# Altium PCB Tarjeta Telemining V1.1 - PCB.PcbDoc
Units mm, origin at the board's own origin, x right, y up, seen from the top; angles counter-clockwise.
Board outline 135.5 x 70.98 mm, 2 copper layers (Top Layer, Bottom Layer); 56 components, 60 nets, 228 pads, 104 vias.
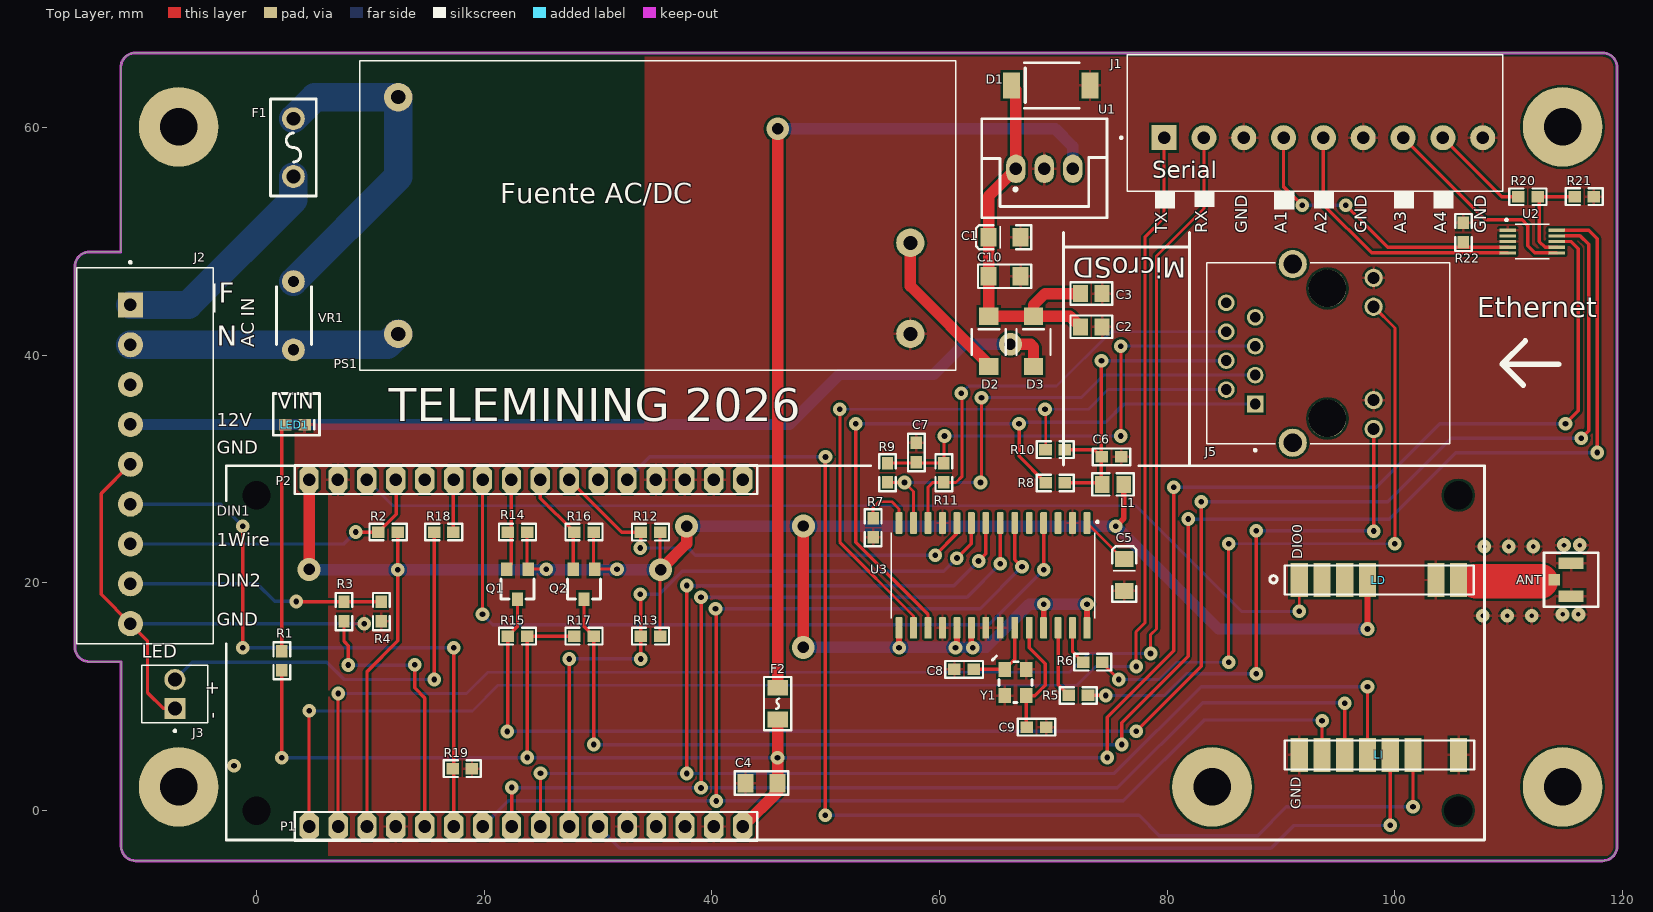
[diagram p0: Top Layer view]
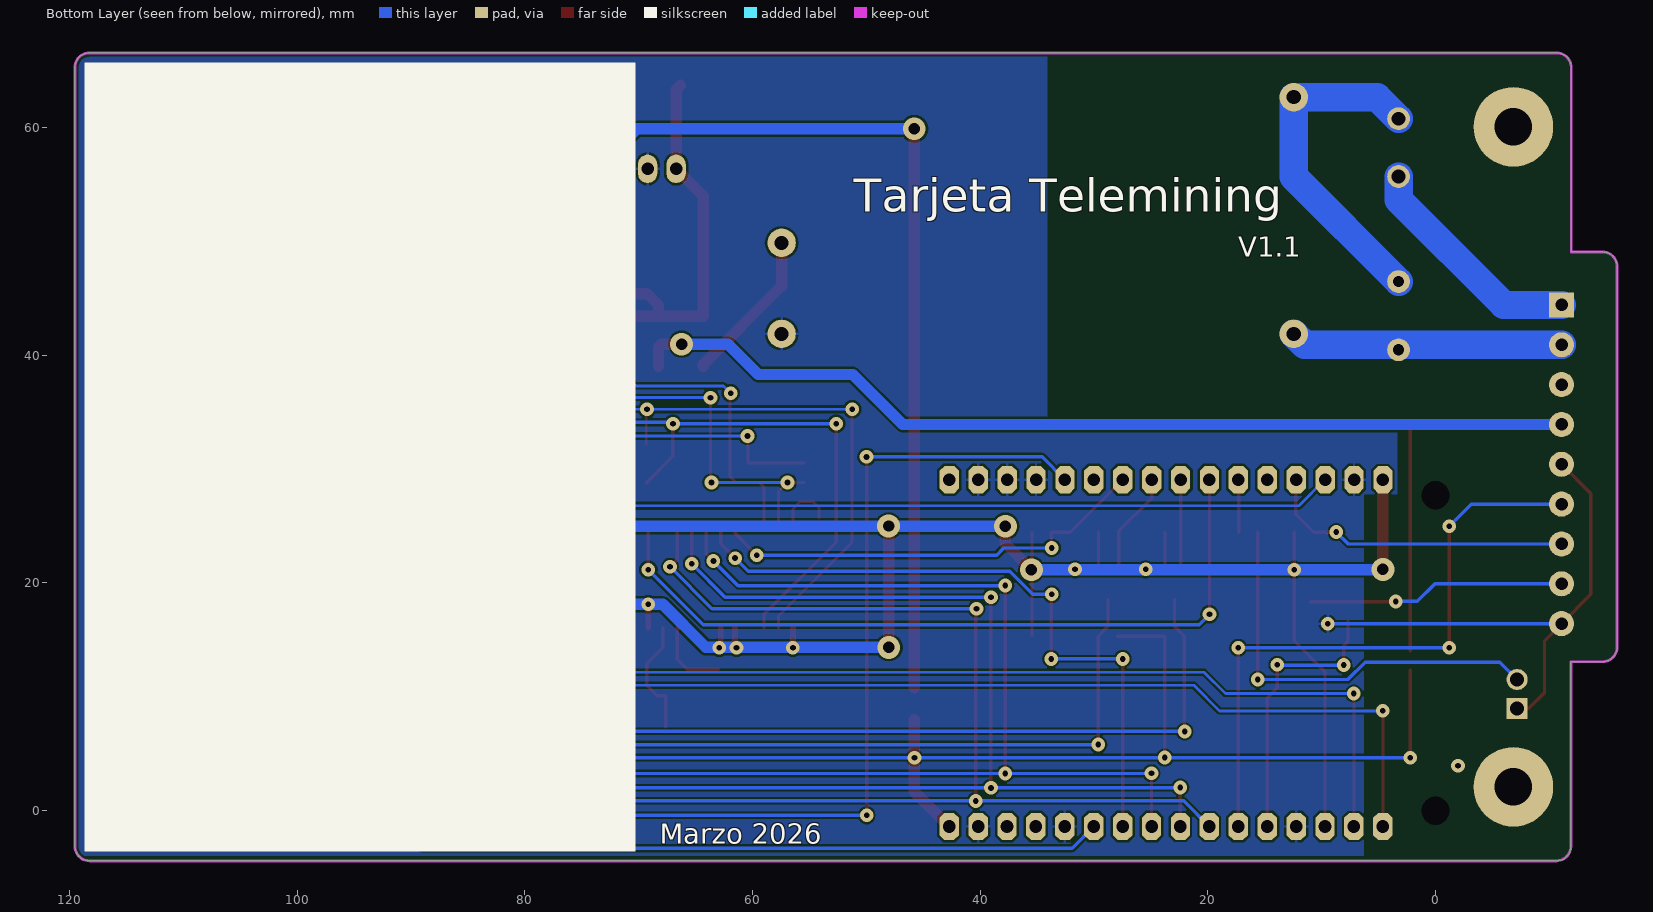
[diagram p1: Bottom Layer view, seen from below]

## Layer stack, top to bottom
Top Layer: signal copper 0.0356
Dielectric: dielectric 0.32, FR-4, Dk 4.8
Bottom Layer: signal copper 0.0356

## Board outline
-15.954,14.351 -15.954,47.811 cw(c-14.684,47.811) -14.684,49.081 -11.925,49.081 -11.925,65.303 cw(c-10.655,65.303) -10.655,66.573 118.275,66.573 cw(c118.275,65.303) 119.545,65.303 119.545,-3.141 cw(c118.275,-3.141) 118.275,-4.411 -10.621,-4.411 cw(c-10.621,-3.141) -11.891,-3.141 -11.891,13.081 -14.684,13.081 cw(c-14.684,14.351)

## Design rules (kind name [scope] priority, off if disabled: settings)
Clearance [All] p1: gap=0.2
PolygonConnect [All] p1: connectstyle=Relief reliefconductorwidth=0.254 reliefentries=4 polygonreliefangle="90 Angle"
RoutingVias [All] p1: holewidth=0.711 width=1.27 viastyle="Through Hole" minholewidth=0.711 minwidth=1.27 maxholewidth=0.711 maxwidth=1.27
SilkscreenOverComponentPads [All] p1: minsilkscreentomaskgap=0.254
SolderMaskExpansion [All] p1: expansion=0.102
Width [All] p1: maxlimit=5 minlimit=0.254 preferedwidth=0.254 minimp=50.000000 maximp=50.000000 favimp=50.000000
27 further rules are at their usual default settings.

## Components (designator, comment, footprint, x,y, rotation, side; value= is the part's Value field where it differs from the comment)
ANT "Tipo Conector" UFL 115.515,20.282 r270 top
C1 "10uF" "Cap tant 10uF 1206 SMD" 67.128,50.381 r180 top
C2 "1uF" "Cap 1uF 0805 SMD" 73.351,42.507 r180 top
C3 "1uF" "Cap 1uF 0805 SMD" 73.351,45.428 r180 top
C4 "10uF" "Cap 10uF 1206 SMD" 45.768,2.413 r180 top
C5 "10uF" "Cap tant 10uF 1206 SMD" 76.248,19.304 r90 top
C6 "10nF" "Cap 0.1uF 0603 SMD" 75.129,31.077 r0 top
C7 "10nF" "Cap 0.1uF 0603 SMD" 57.984,31.458 r90 top
C8 "18pF" "Cap 0.1uF 0603 SMD" 62.175,12.408 r0 top
C9 "18pF" "Cap 0.1uF 0603 SMD" 68.525,7.328 r180 top
C10 "22uF" "Cap 22uF 1206 SMD" 64.334,46.952 r0 top
D1 "Diodo TVS SMD SMBJ20A" "Diodo TVS SMD SMBJ20A" 69.795,63.716 r180 top
D2 "Diodo Schottky SMD" "Diodo CDBA340-G DO-214AC SMD" 64.334,41.237 r90 top
D3 "Diodo Schottky SMD" "Diodo CDBA340-G DO-214AC SMD" 68.271,41.237 r90 top
F1 "Fuse 3A/300V TH" "Fuse 3A/300V TH" 3.247,55.715 r90 top
F2 "Fusible 0.35A SMD" "FUSE 0805 SMD" 45.792,10.795 r270 top
J1 "1985030" PHOENIX_1985030 76.488,54.421 r0 top
J2 "1985030" PHOENIX_1985030 -15.779,47.676 r270 top
J3 "0022292021" MOLEX_0022292021 -7.167,10.249 r270 top
J5 "1664077" PHOENIX_1664077 104.847,32.22 r90 top
L1 "10uF" "Ferrita 3A 30 Ohm 0805" 75.256,28.664 r0 top
LD "Header 8" "Header M8"#1 91.617,20.258 r0 top
LED1 "PWR" "LED Rojo 0603" 3.374,33.898 r0 top
LI "Header 8" "Header M8"#2 91.617,4.891 r0 top
P1 "Header 16" HDR1X16 4.63,-1.397 r0 top locked
P2 "Header 16" HDR1X16 4.62,29.083 r0 top locked (schematic designator P4)
PS1 "IRM-15-12" CONV_IRM-15-12 35.251,52.286 r0 top
Q1 "BSS123" "MOSFET BSS123  SMD SOT-23" 22.932,19.901 r180 top
Q2 "BSS123" "MOSFET BSS123  SMD SOT-23" 28.774,19.901 r180 top
R1 "1K" "Res 1K 0603 1/8W" 2.231,13.17 r270 top
R2 "1K" "Res 1K 0603 1/8W" 11.564,24.473 r0 top
R3 "1K" "Res 1K 0603 1/8W" 7.692,17.488 r270 top
R4 "1K" "Res 1K 0603 1/8W" 10.97,17.488 r270 top
R5 "1K" "Res 1K 0603 1/8W" 72.208,10.122 r180 top
R6 "1K" "Res 1K 0603 1/8W" 73.478,13.043 r180 top
R7 "2K7" "Res 1K 0603 1/8W" 54.174,24.854 r270 top
R8 "50R 1%" "Res 1K 0603 1/8W" 70.176,28.791 r180 top
R9 "50R 1%" "Res 1K 0603 1/8W" 55.444,29.68 r270 top
R10 "50R 1%" "Res 1K 0603 1/8W" 70.174,31.712 r0 top
R11 "50R 1%" "Res 1K 0603 1/8W" 60.397,29.68 r90 top
R12 "10K" "Res 1K 0603 1/8W" 34.616,24.473 r180 top
R13 "100K" "Res 1K 0603 1/8W" 34.616,15.329 r180 top
R14 "10K" "Res 1K 0603 1/8W" 22.931,24.473 r0 top
R15 "10K" "Res 1K 0603 1/8W" 22.931,15.329 r0 top
R16 "10K" "Res 1K 0603 1/8W" 28.773,24.473 r0 top
R17 "10K" "Res 1K 0603 1/8W" 28.775,15.329 r180 top
R18 "1K" "Res 1K 0603 1/8W" 16.455,24.473 r0 top
R19 "10K" "Res 1K 0603 1/8W" 18.082,3.683 r0 top
R20 "100K" "Res 1K 0603 1/8W" 111.705,53.937 r180 top
R21 "100K" "Res 1K 0603 1/8W" 116.658,53.937 r0 top
R22 "10K" "Res 1K 0603 1/8W" 106.045,50.8 r270 top
U1 "OKI-78SR series non-isolated switching regulator" "Reg DC/DC OKI-78SR TH" 66.723,56.388 r0 top
U2 "ADS1115IDGST" SOP50P490X110-10N 112.086,50 r0 top
U3 "ENC28J60-I/SO" SOIC127P1030X265-28N 64.715,20.663 r270 top
VR1 "VARISTOR B72210S0351K101" "VARISTOR  B72210S0351K101" 3.247,41.745 r90 top
Y1 "25MHz" "XTAL 24MHz SMD" 65.731,12.408 r270 top

## Footprints (in the part's own frame and the unit in brackets; to place one, negate y for a bottom-side part, rotate by r counter-clockwise, add the part's x,y. Pads: shape width x height; smd on the part's side, far side on the other; paste and mask are expansions set on the pad)
"Cap 0.1uF 0603 SMD" [mm] "490-1532-2-ND, 81-GRM39X104K16, GRM188R71C104KA01D"
  rect 1.1x1 smd: 1(-0.85,0) 2(0.85,0)
  silkscreen extent -1.65,-0.74 1.65,0.74
"Cap 1uF 0805 SMD" [mm] "490-3903-1-ND, 81-GRM21F51H105ZA12L, GRM21BF51H105ZA12L"
  rect 1.3x1.5 smd: 1(-0.95,0) 2(0.95,0)
  silkscreen extent -1.83,-0.98 1.83,0.98
"Cap 10uF 1206 SMD" [mm] "587-1353-1-ND, 963-TMK316F106ZL-T, TMK316F106ZL-T"
  rect 1.4x1.6 smd: 1(2.8,0) 2(0,0)
  silkscreen extent -0.94,-1.04 3.74,1.03
"Cap 22uF 1206 SMD" [mm] "587-1433-1-ND, 963-EMK316BJ226ML-T, EMK316BJ226ML-T"
  rect 1.4x1.6 smd: 1(2.8,0) 2(0,0)
  silkscreen extent -0.94,-1.03 3.74,1.03
"Cap tant 10uF 1206 SMD" [mm] "478-1655-1-ND, 581-TAJA106K016R, TAJA106K016RNJ"
  rect 1.4x1.6 smd: 1(2.8,0) 2(0,0)
  silkscreen extent -0.95,-1.06 3.91,1.05
CONV_IRM-15-12 [mm]
  round 2.5 hole 1.24: +V(22.2,-2.4) -V(22.2,-10.4) AC/L(-22.8,10.4) AC/N(-22.8,-10.4)
  silkscreen extent -26.2,-13.6 26.2,13.6
"Diodo CDBA340-G DO-214AC SMD" [mm] "641-1101-1-ND, 750-CDBA340-G, CDBA340-G"
  rect 1.5x1.7 smd: 1(-2.2,0) 2(2.2,0)
  silkscreen extent -1.21,-1.5 1.06,1.5
"Diodo TVS SMD SMBJ20A" [mm] "SMBJ20ABTR-ND"
  rect 1.5x2.3 smd: 1(-3.44,0) 2(3.44,0)
  silkscreen extent -2.5,-2 2.34,2
"Ferrita 3A 30 Ohm 0805" [mm] "MH2029-300YCT-ND,,MH2029-300Y"
  rect 1.3x1.5 smd: 1(-0.95,0) 2(0.95,0)
  silkscreen extent -1.83,-0.98 1.83,0.98
"Fuse 3A/300V TH" [mm] "F5461CT-ND"
  round 2 hole 1.2: 1(0,0) 2(5.08,0)
  silkscreen extent -1.7,-2 6.8,2
"FUSE 0805 SMD" [mm] "F3732CT-ND, 576-1206L035/16YR, 1206L035/16YR"
  rect 1.4x1.8 smd: 1(0,0) 2(2.8,0)
  silkscreen extent -0.94,-1.2 3.74,1.2
HDR1X16 [mm] "Connector; Header; 16 Position"
  oct 1.7x2.4 hole 1.1: 1(0,0) 2(2.54,0) 3(5.08,0) 4(7.62,0) 5(10.16,0) 6(12.7,0) 7(15.24,0) 8(17.78,0) 9(20.32,0) 10(22.86,0) 11(25.4,0) 12(27.94,0) 13(30.48,0) 14(33.02,0) 15(35.56,0) 16(38.1,0)
  silkscreen extent -1.27,-1.27 39.37,1.27
"Header M8"#1 [mm]
  rect 1.5x3 smd: 1(0,0) 2(2,0) 3(4,0) 4(6,0) 7(12,0) 8(14,0)
  silkscreen extent -1.27,-1.27 15.33,1.27
"Header M8"#2 [mm]
  rect 1.5x3 smd: 1(0,0) 2(2,0) 3(4,0) 4(6,0) 5(8,0) 6(10,0) 8(14,0)
  silkscreen extent -1.27,-1.27 15.37,1.27
"LED Rojo 0603" [mm] "475-2512-1-ND, 720-LSQ976-NR-1, LS Q976-NR-1"
  rect 1.1x1 smd: 1(-0.85,0) 2(0.85,0)
  silkscreen extent 1.7,-0.4 1.7,0.4, body extent -0.85,-0.4 0.75,0.4, height 0.8
MOLEX_0022292021 [mm]
  rect 1.86x1.86 / inner round 1.86 / far side rect 1.86x1.86 hole 1.24: 1(1.27,0)
  round 1.86 hole 1.24: 2(-1.27,0)
  silkscreen extent -2.54,-2.92 3.35,2.88
"MOSFET BSS123  SMD SOT-23" [mm] "BSS123NCT-ND, 512-BSS123, BSS123"
  rect 1x1.2 smd: 1(-0.95,-1.32) 2(0.95,-1.32) 3(0,1.32)
  silkscreen extent -1.44,-0.47 1.44,1.31, body extent -1.75,-1.1 1.75,1.32, height 1.05
PHOENIX_1664077 [mm]
  rect 1.458x1.458 / inner round 1.458 / far side rect 1.458x1.458 hole 0.95: P1(3.505,17.1)
  round 1.458 hole 0.95: P2(4.775,19.64) P3(6.045,17.1) P4(7.315,19.64) P5(8.585,17.1) P6(9.855,19.64) P7(11.125,17.1) P8(12.395,19.64)
  round 1.605 hole 1.07: P11(1.31,6.69) P12(3.85,6.69) P13(12.05,6.69) P14(14.59,6.69)
  round 2.475 hole 1.65: SH1(0.1,13.8) SH2(15.8,13.8)
  round 3.3 hole 3.3 unplated: ""(2.235,10.75) ""(13.665,10.75)
  silkscreen extent -0.65,0 15.9,21.35
PHOENIX_1985030 [mm]
  rect 2.2x2.2 hole 1.1: 1(3.25,4.7)
  round 2.2 hole 1.1: 2(6.75,4.7) 3(10.25,4.7) 4(13.75,4.7) 5(17.25,4.7) 6(20.75,4.7) 7(24.25,4.7) 8(27.75,4.7) 9(31.25,4.7)
  silkscreen extent -0.6,0 33,12
"Reg DC/DC OKI-78SR TH" [mm] "811-2196-5-ND, , OKI-78SR-5/1.5-W36-C"
  oval 1.7x2.5 hole 1.1: 1(0,0) 2(2.5,0) 3(5,0)
  silkscreen extent -3,-4.3 8,4.4, body extent -2.71,-3.3 7.71,5.33, height 16.51
"Res 1K 0603 1/8W" [mm] "RNCP0603FTD1K00CT-ND, 660-SG73S1JTTD1001F, RNCP0603FTD1K00"
  rect 1.1x1 smd: 1(-0.85,0) 2(0.85,0)
  silkscreen extent -1.63,-0.73 1.63,0.73, body extent -1.5,-0.6 1.5,0.6, height 0.6
SOIC127P1030X265-28N [mm]
  rrect25% 1.9x0.6 smd: 1(-4.605,8.255) 2(-4.605,6.985) 3(-4.605,5.715) 4(-4.605,4.445) 5(-4.605,3.175) 6(-4.605,1.905) 7(-4.605,0.635) 8(-4.605,-0.635) 9(-4.605,-1.905) 10(-4.605,-3.175) 11(-4.605,-4.445) 12(-4.605,-5.715) 13(-4.605,-6.985) 14(-4.605,-8.255) 15(4.605,-8.255) 16(4.605,-6.985) 17(4.605,-5.715) 18(4.605,-4.445) 19(4.605,-3.175) 20(4.605,-1.905) 21(4.605,-0.635) 22(4.605,0.635) 23(4.605,1.905) 24(4.605,3.175) 25(4.605,4.445) 26(4.605,5.715) 27(4.605,6.985) 28(4.605,8.255)
  silkscreen extent -4.8,-8.95 3.75,9.27, body extent -5.15,-8.95 5.15,8.95, height 2.65
SOP50P490X110-10N [mm]
  rrect25% 1.47x0.28 smd: 1(-2.15,1) 2(-2.15,0.5) 3(-2.15,0) 4(-2.15,-0.5) 5(-2.15,-1) 6(2.15,-1) 7(2.15,-0.5) 8(2.15,0) 9(2.15,0.5) 10(2.15,1)
  silkscreen extent -2.36,-1.5 1.5,2, body extent -2.45,-1.5 2.45,1.5, height 1.1
UFL [mm]
  rect 1x1 smd: 1(0,-1.5)
  rect 1x2.2 smd: 2(-1.45,0) 2(1.45,0)
  silkscreen extent -2.37,-2.37 2.37,2.37, body extent -1.7,-1.55 1.7,1.55, height 1.25
"VARISTOR  B72210S0351K101" [mm] "495-6461-ND"
  round 2 hole 1: 1(-1.26,0) 2(4.74,0)
  silkscreen extent -0.8,-1.6 4.28,1.5
"XTAL 24MHz SMD" [mm] "XC2477CT-ND,,ECS-240-9-33B-CWN-TR"
  rect 1.3x1.1 smd: 1(0,0) 2(2.3,0) 3(2.3,1.9) 4(0,1.9)
  silkscreen extent -1.18,-1.09 2.9,2.4

## Part data
ANT: library part ANTSMA
C1 C5: library part "Cap 10uF tantalio SMD", "10uF 16V 10%"
C2 C3: library part "Cap 1uF SMD", "1uF 50V"
C4: library part "Cap 10uF SMD", "10uF 25V"
C6 C7 C8 C9: library part "Cap 0.1uF SMD", "0.1uF 16V"
C10: library part "Cap 22uF SMD", "22uF 16V"
D2 D3: "Schottky Rectifiers 40V 3A CDBA340-G"
F2: "PTC 0.35A 16V"
J3: "Connector Header Through Hole 2 position 0.100\" (2.54mm)"
L1: library part Inductor, "BEAD FERRITE 30 OHM 3A"
LD LI: "Header, 8-Pin"
LED1: library part "LED Rojo", "LED Rojo 0603"
P1 P2: "https://lilygo.cc/en-us/products/t-a7608e-h?variant=43932699033781"
PS1: "Enclosed AC DC Converters 1 Uitgang 12V - - - 1.25A 85 ~ 305 VAC, 120 ~ 430 VDC Input"
Q1 Q2: library part "MOSFET N-Channel_2", "MOSFET N-CH 100V 170MA"
R1 R2 R3 R4 R5 R6 R7 R8 R9 R10 R11 R12 R13 R14 R15 R16 R17 R18 R19 R20 R21 R22: library part "Res 1K SMD", "1K SMD"
U1: library part "REG 5V 1.5A OKI 78SR", "Regulator 5V 1.5A"
U2: "16-bit, 860-SPS, 4-channel, delta-sigma ADC with PGA, oscillator, VREF, comparator and I2C"
U3: "8 KB RAM, MAC&PHY, ETHERNET CONTROLLER, 28 PIN SOIC"
Y1: library part "XTAL 24MHz", "CRYSTAL 24MHZ 9PF SMD"

## Free pads (board coordinates)
  round 7 hole 3.3: 0(-6.84,2.083) 0(-6.84,60.083) 0(83.96,2.083) 0(114.76,2.083) 0(114.76,60.083)
  round 1.524 hole 2.5: 0(0,0) 2(0,27.71) 2(105.59,0) 2(105.59,27.71)

## Via types
v1: diameter 1.2, hole 0.5, Top Layer to Bottom Layer, tented both sides, 87 vias
v2: diameter 1.2, hole 0.4, Top Layer to Bottom Layer, tented both sides, 10 vias
v3: diameter 2, hole 1, Top Layer to Bottom Layer, tented both sides, 7 vias

## Nets (pads, with @x,y where several pads share a name; then routed paths per layer and width w, separated by ;. In a path a pad name is that pad's centre, name@x,y a point inside that pad or via, vN(x,y) a via of type N, cw(c..) or ccw(c..) an arc to the next point about the centre after c; other vN are vias at no path point)
3V3: L1.2 LD.4 P1.3 P2.1 Q1.1 Q2.1 R2.2 R12.1 R13.1 R14.2 R16.2 U3.15 U3.19 U3.20 U3.25 U3.28 | length 208
  Top Layer w0.254: Q1.1@23.781,21.322 R14.2 ; Q1.1 25.446,21.221 v1(25.472,21.195) ; Q2.1@29.623,21.322 R16.2 ; Q2.1 31.645,21.221 v1(31.671,21.195) ; R13.1 R12.1
  Top Layer w0.3: P1.3 9.71,12.202 12.414,14.906 v1(12.414,21.171) R2.2
  Top Layer w0.5: v1(56.46,14.313) U3.15 ; v1@61.54,14.313 U3.19 ; v1@62.81,14.313 U3.20 ; U3.25 v1(69.16,18.123) ; U3.28 v1(72.97,18.123) ; v1(75.51,24.981) 76.206,25.677 L1.2 ; v1(97.617,15.955) LD.4
  Top Layer w1: v3(4.62,21.195) P2.1 ; v3(35.505,21.171) 37.791,23.457 v3(37.791,24.981) ; v3(48.03,14.337) 48.054,14.361 v3(48.054,25.005)
  Bottom Layer w1: v3(4.62,21.195) 4.644,21.171 v1(12.414,21.171) v1@31.647,21.171 ; v1(31.671,21.195) v1@31.647,21.171 ; v3(35.505,21.171) v1@31.647,21.171 ; v3(37.791,24.981) v1(75.51,24.981) 84.536,15.955 v1(97.617,15.955) ; v3(48.03,14.337) 64.104,14.337 67.89,18.123 v1(72.97,18.123)
  other v1: 61.413,14.313 62.937,14.313
5V: C4.2 F2.2 P1.16 R1.2 R15.2 R17.2 U2.8 | length 186.6
  Top Layer w0.3: v1@2.231,4.699 R1.2 ; v1(23.781,4.661) R15.2 R17.2 ; v1(74.748,4.661) 74.748,8.217 80.59,14.059 v1(80.59,28.41) ; U2.8 115.515,50 116.15,49.365 116.15,35.141 v1(115.007,33.998)
  Top Layer w1: P1.16 45.792,1.665 F2.2
  Bottom Layer w0.3: v1@2.207,4.661 v1(23.781,4.661) v1(74.748,4.661) ; v1(80.59,28.41) 98.37,28.41 103.958,33.998 v1(115.007,33.998)
  other v1: 2.216,4.652 45.777,4.652
12VDC: C1.1 C2.2 C3.2 C10.2 D1.2 D2.2 D3.2 U1.1 | length 35.4
  Top Layer w1: D1.2 66.723,63.348 U1.1 64.334,53.999 D2.2 D3.2 ; C2.2 71.471,43.437 D3.2 ; C3.2 69.287,45.428 68.271,44.412 D3.2
12VIN: D3.1 J2.4 | length 84.1
  Top Layer w1: v3(66.239,40.983) 68.017,40.983 68.271,40.729 D3.1
  Bottom Layer w1: J2.4 46.808,33.926 51.198,38.316 59.508,38.316 62.175,40.983 v3(66.239,40.983)
"A1 4-20MA": J1.4 R22.2 U2.4 | length 26.2
  Top Layer w0.3: J1.4 90.238,54.83 v1(91.893,53.175) ; v1(95.703,53.175) 99.378,49.5 U2.4
  Bottom Layer w0.3: v1(91.893,53.175) v1(95.703,53.175)
A2: J1.5 U2.5 | length 23.8
  Top Layer w0.3: J1.5 93.738,53.235 97.973,49 U2.5
A3: J1.7 U2.6 | length 18.7
  Top Layer w0.3: J1.7 107.954,51.905 111.197,51.905 111.705,51.397 111.705,49.619 112.324,49 U2.6
A4: R20.1 R21.1 U2.7 | length 9
  Top Layer w0.3: U2.7 113.221,49.5 112.721,50 112.721,53.771 R20.1 R21.1
"A4 10V": J1.8 R20.2 | length 8.8
  Top Layer w0.3: J1.8 109.422,53.937 R20.2
ANT: ANT.1 LD.8 | length 5.7
  Top Layer w3: 107.133,20.155 112.848,20.155
E_CLKOUT: U3.3
F: F1.1 J2.1 | length 20.2
  Bottom Layer w2.5: J2.1 -6.01,44.426 3.247,53.683 F1.1
GND: ANT.2 C1.2 C2.1 C3.1 C4.1 C5.2 C6.2 C7.2 C8.1 C9.1 C10.1 D1.1 J1.3 J1.6 J1.9 J2.5 J2.9 J3.1 J5.P12 J5.P14 LD.7 LED1.2 LI.1 LI.8 P1.4 P1.12 P1.15 P2.2 P2.13 P2.14 P2.15 PS1.-V R4.2 R7.2 R19.2 R21.2 R22.1 U1.2 U2.1 U2.3 U3.2 U3.11 U3.18 U3.21 U3.22 Y1.2 Y1.4 | length 46.7
  Top Layer w0.3: J2.5 -13.644,27.861 -13.644,18.991 J2.9 -9.58,14.927 -9.58,10.376 -8.183,8.979 J3.1
  Bottom Layer w0.3: J2.9 v1@9.851,16.426
  other v1: 9.47,16.426
  other v2: 107.744,17.107 109.903,17.107 112.062,17.107 114.753,17.234 116.15,17.234 107.871,23.203 110.03,23.203 112.189,23.203 114.88,23.33 116.277,23.33
"GPIO 0": P1.13
"GPIO 01": P1.5 R3.2 | length 24.4
  Top Layer w0.3: R3.2 7.692,14.859 8.073,14.478 v1(8.073,12.789) ; v1@13.891,12.827 13.891,10.795 14.79,9.896 P1.5
  Bottom Layer w0.3: v1(8.073,12.789) 13.871,12.789 v1(13.9,12.818)
"GPIO 02": J2.6 P1.6 R19.1 | length 55
  Top Layer w0.3: v1(-1.198,14.313) v1(-1.198,24.981) ; P1.6 17.33,13.706
  Bottom Layer w0.3: J2.6 -3.143,26.926 v1(-1.198,24.981) ; v1(-1.198,14.313) v1(17.339,14.313)
"GPIO 03": J2.7 P2.4 R2.1 | length 27.5
  Top Layer w0.3: v1(8.708,24.473) R2.1 12.264,26.023 12.264,29.059 P2.4
  Bottom Layer w0.3: J2.7 7.661,23.426 v1(8.708,24.473)
"GPIO 45": P2.11
"GPIO 46": P2.5
LED_ST: P2.6 R18.2 | length 4.6
  Top Layer w0.3: R18.2 P2.6@17.305,29.068
"LORA DIO0": LD.1 P2.3 | length 89.5
  Top Layer w0.254: v1(91.617,17.51) LD.1
  Bottom Layer w0.254: P2.3 12,26.783 77.264,26.783 86.537,17.51 v1(91.617,17.51)
"LORA RESET": LI.6 P2.12 | length 107.7
  Top Layer w0.3: v1(49.983,-0.419) v1@49.983,31.068 ; v1(101.617,0.343) LI.6
  Bottom Layer w0.3: P2.12 34.554,31.077 v1(49.992,31.077) ; v1(49.983,-0.419) 77.542,-0.419 79.32,-2.197 87.956,-2.197 90.496,0.343 v1(101.617,0.343)
M1: LD.2
M2: LD.3
N: J2.2 PS1.AC/N VR1.1 | length 23.9
  Bottom Layer w2.5: J2.2 11.491,40.926 PS1.AC/N
NetC5_1: C5.1 U3.1 | length 4.6
  Top Layer w0.254: U3.1 76.134,22.104 C5.1
NetC8_2: C8.2 U3.23 Y1.1 | length 6.7
  Top Layer w0.3: C8.2 Y1.1 66.62,13.297 U3.23
NetC9_2: C9.2 U3.24 Y1.3 | length 10.4
  Top Layer w0.3: C9.2@67.631,7.372 Y1.3 68.384,10.108 69.287,11.011 69.287,12.916 67.89,14.313 U3.24
NetD2_1: D2.1 PS1.+V | length 13.7
  Top Layer w1: PS1.+V 57.451,46.088 64.334,39.205 D2.1
NetF1_2: F1.2 PS1.AC/L VR1.2 | length 30
  Bottom Layer w2.5: VR1.2 12.451,55.689 PS1.AC/L 5.138,62.686 F1.2
NetF2_1: F2.1 U1.3 | length 76.8
  Top Layer w1: F2.1 v3(45.792,59.906)
  Bottom Layer w1: v3@46.681,59.906 70.176,59.906 71.723,58.359 U1.3
NetJ2_8: J2.8 R3.1 R4.1 | length 23.1
  Top Layer w0.3: v1(3.501,18.377) 3.54,18.338 R3.1@8.073,18.338 ; R3.1 R4.1
  Bottom Layer w0.3: J2.8 0.047,19.926 1.596,18.377 v1(3.501,18.377)
NetJ3_2: J3.2 R18.1 | length 36.9
  Top Layer w0.3: v1(15.605,11.519) R18.1
  Bottom Layer w0.3: J3.2 -5.643,13.043 6.168,13.043 7.692,11.519 v1@15.566,11.519
NetJ5_P11: J5.P11 R5.1 | length 47.3
  Top Layer w0.3: R5.1 v1@74.621,10.122 ; v1(87.838,12.018) v1@87.838,24.591 ; v1(98.157,24.559) J5.P11
  Bottom Layer w0.3: v1(74.63,10.113) 79.819,10.113 81.733,12.027 v1@87.829,12.027 ; v1(87.847,24.582) v1@98.007,24.582
NetJ5_P13: J5.P13 R6.1 | length 59
  Top Layer w0.254: R6.1 74.328,12.955 v1(75.764,11.519) ; v1(85.416,13.025) v1@85.416,23.457 ; J5.P13 100.021,42.406 v1(100.021,23.457)
  Bottom Layer w0.254: v1(75.764,11.519) 79.32,11.519 80.835,13.034 v1@85.407,13.034 ; v1(85.425,23.448) v1@100.021,23.448
NetLED1_1: LED1.1 R1.1 | length 20
  Top Layer w0.3: R1.1 2.231,33.605 LED1.1
NetR5_2: R5.2 U3.26 | length 6.3
  Top Layer w0.3: U3.26 70.43,11.05 R5.2
NetR6_2: R6.2 U3.27 | length 3.4
  Top Layer w0.3: U3.27 71.7,13.971 R6.2
NetR7_1: R7.1 U3.14 | length 4.9
  Top Layer w0.254: R7.1 54.174,26.632 54.682,27.14 55.825,27.14 56.46,26.505 U3.14
RST: P1.14
RX: J1.2 P1.2 | length 131.8
  Top Layer w0.254: P1.2 v1(7.17,10.287) ; v1(78.558,13.805) 78.558,15.456 79.066,15.964 79.066,48.73 83.238,52.902 J1.2
  Bottom Layer w0.254: v1(7.17,10.287) 18.463,10.287 20.33,12.154 71.446,12.154 73.097,13.805 v1(78.558,13.805)
SCL_H: Q2.3 R17.1 U2.10 | length 141.8
  Top Layer w0.3: Q2.3 28.774,16.18 R17.1 v1@29.625,6.058 ; v1(76.018,5.804) 76.018,7.709 81.86,13.551 v1(81.86,25.616) ; 114.998,51 117.055,51 117.801,50.254 v1(117.801,31.458)
  Bottom Layer w0.3: v1(29.625,5.804) v1(76.018,5.804) ; v1(81.86,25.616) 99.513,25.616 105.355,31.458 v1(117.801,31.458)
SCL_L: P2.9 Q2.2 R16.1 | length 9.1
  Top Layer w0.3: P2.9 24.94,27.456 27.824,24.572 Q2.2
SDA_H: Q1.3 R15.1 U2.9 | length 145.6
  Top Layer w0.3: v1(22.043,6.947) 22.081,6.985 R15.1 22.932,16.18 Q1.3 ; v1(77.288,6.985) 83.003,12.7 v1(83.003,27.14) v1@83.13,27.267 ; 114.998,50.5 116.285,50.5 117.039,49.746 117.039,33.363 v1(116.404,32.728)
  Bottom Layer w0.3: v1@22.081,6.985 v1(77.288,6.985) ; v1(83.003,27.14) 99.386,27.14 104.974,32.728 v1(116.404,32.728) v1@116.785,32.728
SDA_L: P2.8 Q1.2 R14.1 | length 8
  Top Layer w0.3: Q1.2 22.4,21.639 P2.8
"SPI_ INT_ETH": P2.7 U3.4 | length 67.6
  Top Layer w0.3: v1(19.86,17.258) P2.7 ; v1(69.16,21.171) U3.4
  Bottom Layer w0.3: v1(19.86,17.258) 20.773,16.345 64.334,16.345 v1(69.16,21.171)
"SPI_ RST_ETH": P2.10 R12.2 U3.10 | length 39.6
  Top Layer w0.3: P2.10 30.305,26.258 ; 30.439,26.124 30.305,26.258 ; v1(33.727,23.076) 33.766,23.115 R12.2 32.076,24.473 30.305,26.244 30.305,26.258 ; v1(59.635,22.441) 61.54,24.346 U3.10
  Bottom Layer w0.3: v1(33.727,23.076) 37.932,23.076 38.567,22.441 v1(59.635,22.441)
SPI_CLK: LI.4 P1.9 U3.8 | length 133.1
  Top Layer w0.3: P1.9 v1@24.95,3.292 ; v1(37.791,3.264) v1(37.791,19.774) ; v1(63.445,21.933) 64.08,22.568 U3.8 ; v1@97.608,10.884 v1(97.617,10.875) LI.4
  Bottom Layer w0.3: v1@24.978,3.264 75.383,3.264 83.003,10.884 97.608,10.884 v1(97.617,10.875) ; v1(37.791,19.774) 61.286,19.774 v1(63.445,21.933)
  other v1: 24.959,3.283
SPI_CS_ETH: P1.10 R13.2 U3.9 | length 59.5
  Top Layer w0.3: v1(27.48,13.327) 27.49,13.317 P1.10 ; v1(33.727,19.012) 33.766,18.973 R13.2 33.766,13.336 v1(33.775,13.327) ; v1(61.54,22.187) 62.81,23.457 U3.9
  Bottom Layer w0.3: v1(27.48,13.327) v1(33.775,13.327) ; v1(33.727,19.012) 35.378,19.012 37.41,21.044 60.397,21.044 v1(61.54,22.187)
SPI_CS_LORA: LI.5 P1.11 | length 77.4
  Top Layer w0.3: v1@99.617,-1.285 LI.5
  Bottom Layer w0.3: P1.11 31.935,-3.302 89.137,-3.302 91.131,-1.308 v1@99.617,-1.308
  other v1: 99.626,-1.294
SPI_MISO: LI.2 P1.7 U3.6 | length 130.2
  Top Layer w0.3: v1(40.331,17.742) 40.386,17.687 v1(40.386,0.851) ; U3.6 66.62,22.06 v1(67.255,21.425) ; LI.2 v1@93.617,7.909
  Bottom Layer w0.3: P1.7 22.118,0.851 v1(40.386,0.851) 76.145,0.851 83.257,7.963 v1@93.671,7.963 ; v1(40.331,17.742) 63.572,17.742 v1(67.255,21.425)
  other v1: 93.626,7.9
SPI_MOSI: LI.3 P1.8 U3.7 | length 132.2
  Top Layer w0.3: P1.8 v1@22.41,2.042 ; v1(39.061,1.994) v1(39.061,18.758) ; v1(65.35,21.679) U3.7 ; LI.3 v1(95.617,9.446)
  Bottom Layer w0.3: v1(22.419,2.033) 22.458,1.994 v1(39.061,1.994) 75.637,1.994 83.13,9.487 v1@95.703,9.487 ; v1(39.061,18.758) 62.429,18.758 v1(65.35,21.679)
"TCT I": C7.1 J5.P5 R9.1 R11.2 | length 42.5
  Top Layer w0.254: R9.1 R11.2 v1@60.397,32.855 ; v1(75.948,32.912) v1(75.948,40.805)
  Bottom Layer w0.254: v1(60.454,32.912) v1(75.948,32.912) ; v1@75.891,40.805 v1(75.948,40.805) J5.P5
"TCT O": C6.1 J5.P4 L1.1 R8.1 R10.2 | length 28.7
  Top Layer w0.3: R8.1 74.179,28.791 L1.1 ; R10.2@71.153,31.712 73.605,31.712 C6.1@74.24,31.077 ; v1(74.24,39.535) C6.1@74.24,31.077 ; L1.1@74.663,28.702 74.24,29.125 C6.1@74.24,31.077
  Bottom Layer w0.3: v1(74.24,39.535) J5.P4
TPIN+: J5.P3 R9.2 U3.13 | length 44.8
  Top Layer w0.254: R9.2 v1(56.929,28.83) 57.73,28.029 U3.13 ; v1@63.696,28.413 v1@63.696,36.281
  Bottom Layer w0.254: v1(56.929,28.83) v1(63.611,28.83) ; v1(63.699,36.284) 72.462,36.284 74.443,38.265 J5.P3
TPIN-: J5.P6 R11.1 U3.12 | length 39.3
  Top Layer w0.254: U3.12 59,28.41 59.42,28.83 R11.1 61.452,28.83 62.003,29.381 v1@62.003,36.583
  Bottom Layer w0.254: v1(61.921,36.665) 62.556,37.3 70.303,37.3 75.078,42.075 J5.P6
TPOUT+: J5.P1 R8.2 U3.17 | length 62.6
  Top Layer w0.3: v1(52.65,33.998) 52.65,23.584 59,17.234 U3.17 ; v1(67.001,33.998) 67.001,31.116 R8.2
  Bottom Layer w0.3: v1(52.65,33.998) v1(67.001,33.998) 67.128,34.125 74.621,34.125 76.221,35.725 J5.P1
TPOUT-: J5.P2 R10.1 U3.16 | length 59.6
  Top Layer w0.254: v1(51.253,35.268) 51.253,23.584 57.73,17.107 U3.16 ; v1(69.287,35.268) 69.349,35.206 69.349,32.221
  Bottom Layer w0.254: v1(51.253,35.268) v1(69.287,35.268) 73.097,35.268 74.824,36.995 J5.P2
TX: J1.1 P1.1 | length 131.9
  Top Layer w0.254: P1.1 v1(4.63,8.763) ; v1(77.288,12.662) 77.288,15.71 78.05,16.472 78.05,50.381 79.738,52.069 J1.1
  Bottom Layer w0.254: v1(4.63,8.763) 18.971,8.763 21.219,11.011 72.081,11.011 73.732,12.662 v1(77.288,12.662)
VBAT: P2.16
pads on no net: J2.3 J5. J5.P7 J5.P8 J5.SH1 J5.SH2 U2.2 U3.5
copper on no net:
  other v1: -1.975,3.928

## Polygon pours and split planes (outlines as drawn)
GND on Top Layer "Top Overlay-No Net" (solid, pour order 4): 6.295,27.775 6.295,-3.975 119.198,-3.975 119.198,48.476 119.325,48.476 119.325,65.748 118.817,66.256 34.108,66.256 34.108,34.125 33.981,33.998 3.374,33.998 3.374,27.775
GND on Bottom Layer "Top Overlay-No Net" (solid, pour order 3): 6.295,27.775 6.295,-3.975 119.198,-3.975 119.198,48.476 119.325,48.476 119.325,65.748 118.817,66.256 34.108,66.256 34.108,34.125 33.981,33.998 3.374,33.998 3.374,27.775

## Keep-outs
Keep-Out Layer:
  the board outline again, w0.254

## Silkscreen, mask and mechanical layers (free items; w line width, h text height)
Top Overlay:
  circle w0.254: c89.348,20.32 r0.321
  rectangle: -3.779,43.769 -3.597,46.293
  rectangle: 103.422,52.921 105.181,54.421
  rectangle: 99.922,52.921 101.702,54.445
  rectangle: 92.922,52.921 94.681,54.445
  rectangle: 89.422,52.794 91.181,54.445
  rectangle: 82.426,53.048 84.181,54.445
  rectangle: 78.926,52.921 80.681,54.445
  lines w0.254: -2.66,14.646 -2.66,-2.59 107.88,-2.59 107.88,30.3 77.518,30.3 ; -2.66,27.264 -2.66,30.3 53.949,30.3 ; 70.914,30.353 70.914,50.8 ; 70.914,49.53 81.963,49.53 ; 81.963,30.353 81.963,50.8 ; 1.469,32.982 1.469,36.665 5.533,36.665 5.533,32.982 1.469,32.982
  lines w0.5: 111.298,37.388 109.457,39.229 ; 111.489,41.261 109.457,39.229 ; 114.396,39.229 109.457,39.229
  text "Serial" at 78.685,55.08 h2.5
  text "Fuente AC/DC" at 21.398,52.798 h3
  text "TX" at 80.381,50.738 h1.8 r90
  text "RX" at 83.881,50.738 h1.8 r90
  text "GND" at 87.381,50.738 h1.8 r90
  text "A1" at 90.881,50.738 h1.8 r90
  text "A2" at 94.381,50.738 h1.8 r90
  text "GND" at 97.881,50.738 h1.8 r90
  text "A3" at 101.381,50.738 h1.8 r90
  text "A4" at 104.881,50.738 h1.8 r90
  text "GND" at 108.381,50.738 h1.8 r90
  text "MicroSD" at 81.709,49.149 h3 r180
  text "F" at -3.297,44.069 h3
  text "Ethernet" at 107.26,42.761 h3
  text "AC IN" at 0.199,40.729 h2 r90
  text "N" at -3.508,40.259 h3
  text "VIN" at 1.85,34.887 h2.3
  text "12V" at -3.484,33.363 h2
  text "TELEMINING 2026" at 11.629,33.236 h5
  text "GND" at -3.484,30.95 h2
  text "DIN1" at -3.484,25.616 h1.5
  text "1Wire" at -3.484,22.822 h2
  text "DIO0" at 92.202,22.098 h1.52 r90
  text "DIN2" at -3.484,19.266 h2
  text "GND" at -3.484,15.837 h2
  text "LED" at -10.088,13.043 h2
  text "-   +" at -2.976,8.09 h2 r90
  text "GND" at 92.075,0.127 h1.52 r90
Bottom Overlay:
  rectangle: 70.303,-3.594 118.69,65.748
  text "Tarjeta Telemining" at 51.126,51.651 h5
  text "V1.1" at 17.344,48.095 h3
  text "Marzo 2026" at 68.144,-3.467 h3